# Altium PCB RheoBoard_v2.PcbDoc (part 2 of 5)
Units mm, origin at the board's own origin, x right, y up, seen from the top; angles counter-clockwise.
Board outline 136.04 x 88.34 mm, 2 copper layers (Top Layer, Bottom Layer); 133 components, 71 nets, 341 pads, 184 vias.
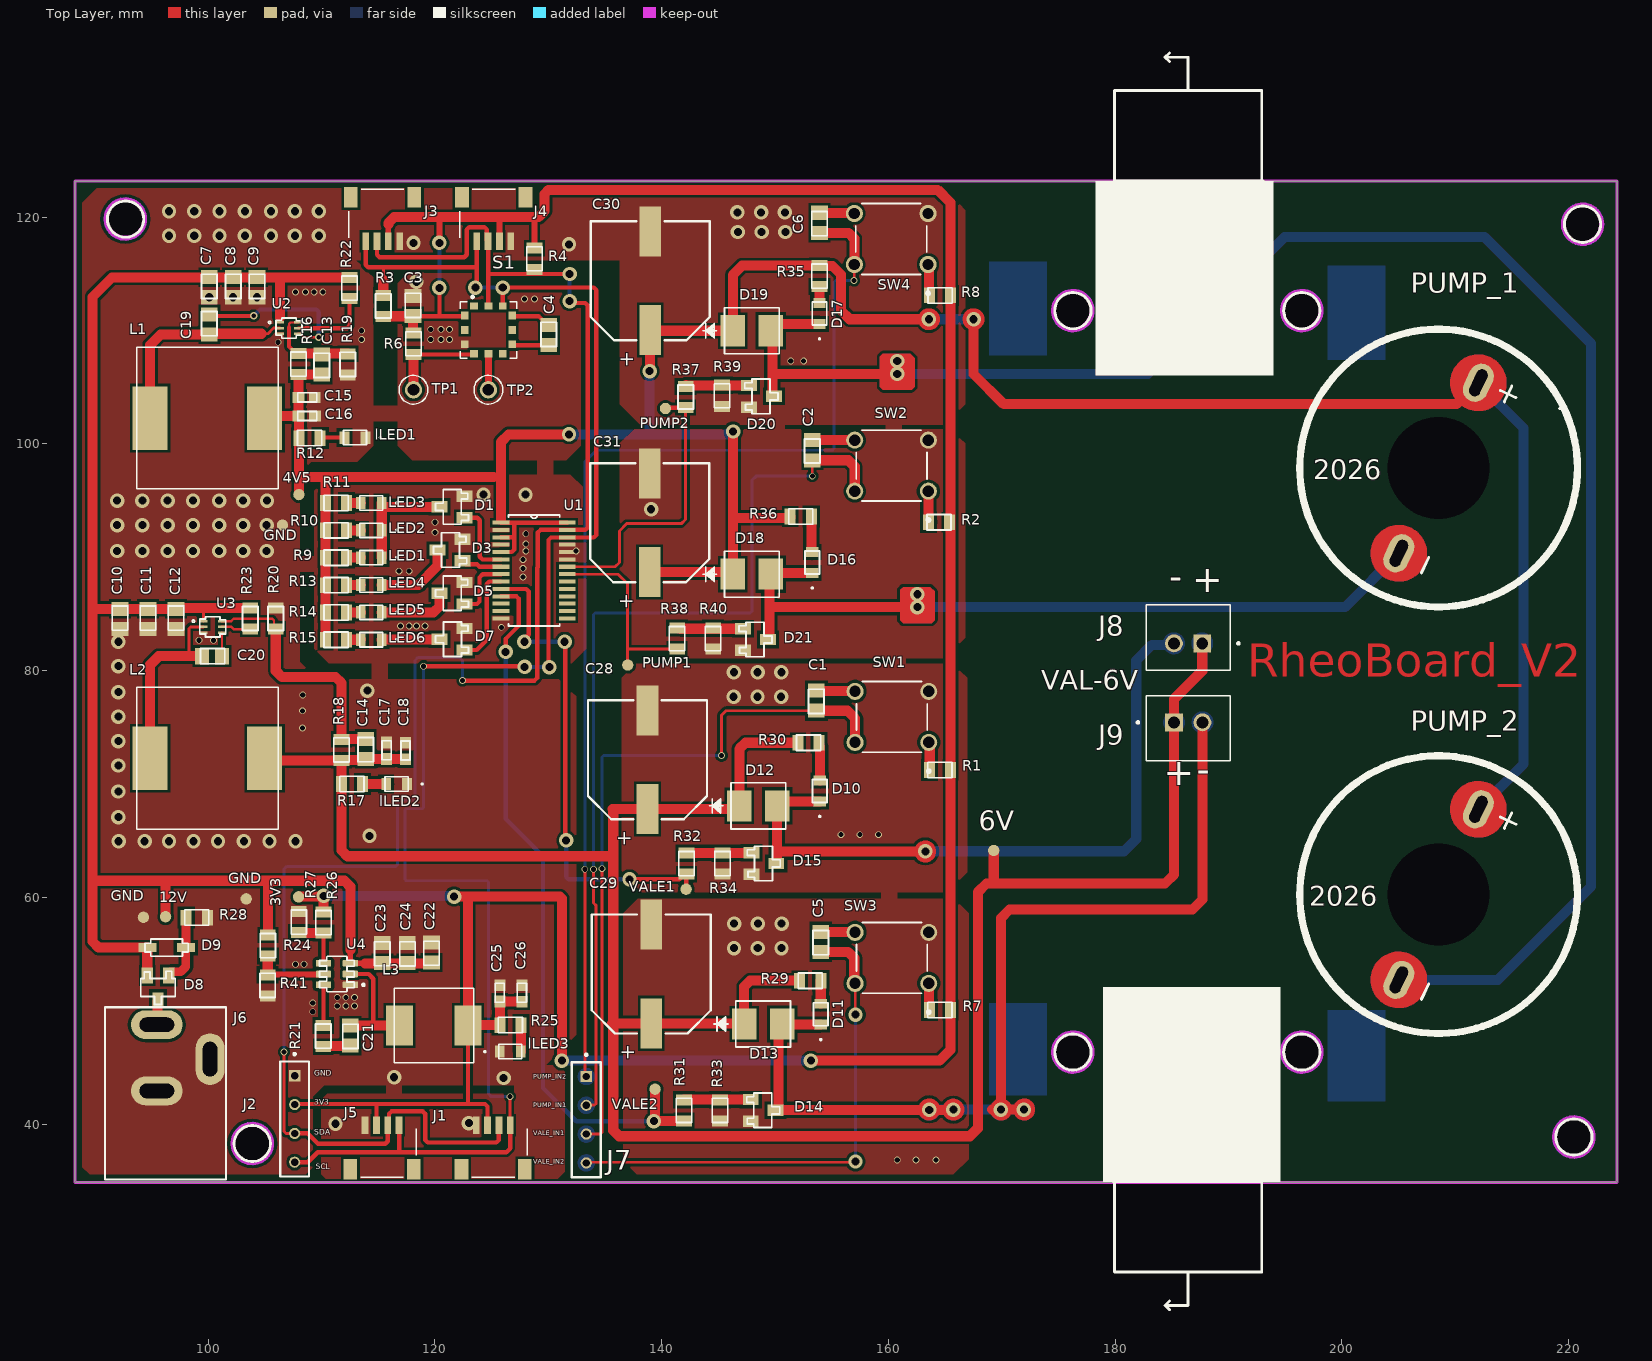
[diagram p0: Top Layer view]

## Part data (continued)
D12 D13 D18 D19: library part "DIODE SCHOTTKY 40V 3A DO214AB", "Rectifier Diode, Schottky, 1 Phase, 1 Element, 3A, 40V V(RRM), Silicon, DO-214AB", Average Rectified Current=3A, Case/Package=SMC, Forward Voltage=500mV, Manufacturer=onsemi, Manufacturer Lifecycle Status=ACTIVE, Manufacturer Part Number=SS34, Max Forward Surge Current (Ifsm)=100A, Max Junction Temperature (Tj)=150°C, Max Power Dissipation=2.27W, Max Repetitive Reverse Voltage (Vrrm)=40V, Max Reverse Leakage Current=500µA, Min Operating Temperature=-55°C, Peak Reverse Current=20mA, Supplier Part Number 1=SS34FSCT-ND, Category="Schottky Diodes", China RoHS=Non-Compliant, ComponentLink1Description=https://datasheet.octopart.com:443/SS34-onsemi-datasheet-180969540.pdf?src-supplier=IHS, ComponentLink1URL=https://datasheet.octopart.com:443/SS34-onsemi-datasheet-180969540.pdf?src-supplier=IHS, ComponentLink2Description=https://datasheet.octopart.com:443/SS34-Fairchild-Semiconductor-datasheet-182300316.pdf?src-supplier=IHS, ComponentLink2URL=https://datasheet.octopart.com:443/SS34-Fairchild-Semiconductor-datasheet-182300316.pdf?src-supplier=IHS, ComponentLink3Description=https://datasheet.octopart.com:443/SS34-ON-Semiconductor-datasheet-98150820.pdf?src-supplier=Upverter, ComponentLink3URL=https://datasheet.octopart.com:443/SS34-ON-Semiconductor-datasheet-98150820.pdf?src-supplier=Upverter, ComponentLink4Description=https://sigma.octopart.com:443/138897342/technical_drawing/ON-Semiconductor-SS34.pdf?src-supplier=Upverter, ComponentLink4URL=https://sigma.octopart.com:443/138897342/technical_drawing/ON-Semiconductor-SS34.pdf?src-supplier=Upverter, ComponentLink5Description=https://datasheet.octopart.com:443/SS34-Fairchild-datasheet-10247.pdf?src-supplier=Fairchild+Semiconductor, ComponentLink5URL=https://datasheet.octopart.com:443/SS34-Fairchild-datasheet-10247.pdf?src-supplier=Fairchild+Semiconductor, ComponentLink6Description=https://datasheet.octopart.com:443/SS34-ON-Semiconductor-datasheet-21199498.pdf?src-supplier=Fairchild+Semiconductor, ComponentLink6URL=https://datasheet.octopart.com:443/SS34-ON-Semiconductor-datasheet-21199498.pdf?src-supplier=Fairchild+Semiconductor, ComponentLink7Description=https://sigma.octopart.com:443/17345394/technical_drawing/Fairchild-Semiconductor-SS34.pdf?src-supplier=Fairchild+Semiconductor, ComponentLink7URL=https://sigma.octopart.com:443/17345394/technical_drawing/Fairchild-Semiconductor-SS34.pdf?src-supplier=Fairchild+Semiconductor, ComponentLink8Description=https://datasheet.octopart.com:443/SS34-ON-Semiconductor-datasheet-137362514.pdf?src-supplier=onsemi, ComponentLink8URL=https://datasheet.octopart.com:443/SS34-ON-Semiconductor-datasheet-137362514.pdf?src-supplier=onsemi, ComponentLink9Description=https://datasheet.octopart.com:443/SS34-ON-Semiconductor-datasheet-85599191.pdf?src-supplier=onsemi, ComponentLink9URL=https://datasheet.octopart.com:443/SS34-ON-Semiconductor-datasheet-85599191.pdf?src-supplier=onsemi, ComponentLink10Description=https://datasheet.octopart.com:443/SS34-ON-Semiconductor-datasheet-86698610.pdf?src-supplier=onsemi, ComponentLink10URL=https://datasheet.octopart.com:443/SS34-ON-Semiconductor-datasheet-86698610.pdf?src-supplier=onsemi, ComponentLink11Description=https://datasheet.octopart.com:443/SS34-ON-Semiconductor-datasheet-86692994.pdf?src-supplier=Farnell, ComponentLink11URL=https://datasheet.octopart.com:443/SS34-ON-Semiconductor-datasheet-86692994.pdf?src-supplier=Farnell, ComponentLink12Description=https://datasheet.octopart.com:443/SS34-Fairchild-Semiconductor-datasheet-16207785.pdf?src-supplier=Farnell, ComponentLink12URL=https://datasheet.octopart.com:443/SS34-Fairchild-Semiconductor-datasheet-16207785.pdf?src-supplier=Farnell, ComponentLink13Description=https://datasheet.octopart.com:443/SS34-Fairchild-Semiconductor-datasheet-17852663.pdf?src-supplier=Newark, ComponentLink13URL=https://datasheet.octopart.com:443/SS34-Fairchild-Semiconductor-datasheet-17852663.pdf?src-supplier=Newark, ComponentLink14Description=https://datasheet.octopart.com:443/SS34-Fairchild-Semiconductor-datasheet-66805556.pdf?src-supplier=Newark, ComponentLink14URL=https://datasheet.octopart.com:443/SS34-Fairchild-Semiconductor-datasheet-66805556.pdf?src-supplier=Newark, ComponentLink15Description=https://datasheet.octopart.com:443/SS34-ON-Semiconductor-datasheet-137713514.pdf?src-supplier=TME, ComponentLink15URL=https://datasheet.octopart.com:443/SS34-ON-Semiconductor-datasheet-137713514.pdf?src-supplier=TME, ComponentLink16Description=https://datasheet.octopart.com:443/SS34-Fairchild-Semiconductor-datasheet-10520288.pdf?src-supplier=Jameco+(USA), ComponentLink16URL=https://datasheet.octopart.com:443/SS34-Fairchild-Semiconductor-datasheet-10520288.pdf?src-supplier=Jameco+(USA), ComponentLink17Description=https://datasheet.octopart.com:443/SS34.-Fairchild-Semiconductor-datasheet-8187732.pdf?src-supplier=Jameco+(USA), ComponentLink17URL=https://datasheet.octopart.com:443/SS34.-Fairchild-Semiconductor-datasheet-8187732.pdf?src-supplier=Jameco+(USA), ComponentLink18Description=https://datasheet.octopart.com:443/SS34-Fairchild-Semiconductor-datasheet-14041527.pdf?src-supplier=iiiC, ComponentLink18URL=https://datasheet.octopart.com:443/SS34-Fairchild-Semiconductor-datasheet-14041527.pdf?src-supplier=iiiC, ComponentLink19Description=https://datasheet.octopart.com:443/SS34-Fairchild-datasheet-3545.pdf?src-supplier=DigiKey, ComponentLink19URL=https://datasheet.octopart.com:443/SS34-Fairchild-datasheet-3545.pdf?src-supplier=DigiKey, ComponentLink20Description=https://datasheet.octopart.com:443/SS34-Fairchild-Semiconductor-datasheet-67150810.pdf?src-supplier=element14+APAC, ComponentLink20URL=https://datasheet.octopart.com:443/SS34-Fairchild-Semiconductor-datasheet-67150810.pdf?src-supplier=element14+APAC, ComponentLink21Description=https://datasheet.octopart.com:443/SS34-Fairchild-Semiconductor-datasheet-67301494.pdf?src-supplier=element14+APAC, ComponentLink21URL=https://datasheet.octopart.com:443/SS34-Fairchild-Semiconductor-datasheet-67301494.pdf?src-supplier=element14+APAC, ComponentLink22Description=https://datasheet.octopart.com:443/SS34-Fairchild-Semiconductor-datasheet-68552117.pdf?src-supplier=element14+APAC, ComponentLink22URL=https://datasheet.octopart.com:443/SS34-Fairchild-Semiconductor-datasheet-68552117.pdf?src-supplier=element14+APAC, ComponentLink23Description=http://sigma.octopart.com:80/150631730/rohs_statement/ON-Semiconductor-SS34.pdf?src-supplier=Compliance+Statements, ComponentLink23URL=http://sigma.octopart.com:80/150631730/rohs_statement/ON-Semiconductor-SS34.pdf?src-supplier=Compliance+Statements, ComponentLink24Description=http://sigma.octopart.com:80/17357496/reach_statement/Fairchild-Semiconductor-SS34.pdf?src-supplier=Compliance+Statements, ComponentLink24URL=http://sigma.octopart.com:80/17357496/reach_statement/Fairchild-Semiconductor-SS34.pdf?src-supplier=Compliance+Statements, ComponentLink25Description=http://sigma.octopart.com:80/17357497/materials_sheet/Fairchild-Semiconductor-SS34.pdf?src-supplier=Compliance+Statements, ComponentLink25URL=http://sigma.octopart.com:80/17357497/materials_sheet/Fairchild-Semiconductor-SS34.pdf?src-supplier=Compliance+Statements, ComponentLink26Description=http://sigma.octopart.com:80/33332724/reach_statement/Fairchild-Semiconductor-SS34.pdf?src-supplier=Compliance+Statements, ComponentLink26URL=http://sigma.octopart.com:80/33332724/reach_statement/Fairchild-Semiconductor-SS34.pdf?src-supplier=Compliance+Statements, ComponentLink27Description=http://sigma.octopart.com:80/33332734/materials_sheet/Fairchild-Semiconductor-SS34.pdf?src-supplier=Compliance+Statements, ComponentLink27URL=http://sigma.octopart.com:80/33332734/materials_sheet/Fairchild-Semiconductor-SS34.pdf?src-supplier=Compliance+Statements, ComponentLink28Description=http://sigma.octopart.com:80/reach_statement/ON-Semiconductor-company-79.pdf?src-supplier=Compliance+Statements, ComponentLink28URL=http://sigma.octopart.com:80/reach_statement/ON-Semiconductor-company-79.pdf?src-supplier=Compliance+Statements, ComponentLink29Description=http://sigma.octopart.com:80/rohs_statement/Fairchild-Semiconductor-company-11.pdf?src-supplier=Compliance+Statements, ComponentLink29URL=http://sigma.octopart.com:80/rohs_statement/Fairchild-Semiconductor-company-11.pdf?src-supplier=Compliance+Statements, ComponentLink30Description=http://sigma.octopart.com:80/rohs_statement/Fairchild-Semiconductor-company-10.pdf?src-supplier=Compliance+Statements, ComponentLink30URL=http://sigma.octopart.com:80/rohs_statement/Fairchild-Semiconductor-company-10.pdf?src-supplier=Compliance+Statements, ComponentLink31Description=http://sigma.octopart.com:80/reach_statement/Fairchild-Semiconductor-company-9.pdf?src-supplier=Compliance+Statements, ComponentLink31URL=http://sigma.octopart.com:80/reach_statement/Fairchild-Semiconductor-company-9.pdf?src-supplier=Compliance+Statements, ComponentLink32Description=https://octopart.com:443/opatz8j6/c1?t=viccNpvfIttKsDU7SPWQ9y4zH2I5vQeoMbVHGqsPow6bTd-4svAQ8CJcd4JU32n4VIK7bfuhyC2yX38EOaXgXF3OB3U3oRNmsYMqF9qk35vU8wFPIavaR-14DwP6fbfQaPsGNFdN_Z8-1T4X_QOZn0ACTRQW8byAb0Zw5uR49QIr8HPTSX9wA8MtVUNYB4ZuZLRADJrwn9SaYPFjqtJKagfgGDofRU13OmWhy1c_plwGeXj2LiYJThcM9cEbMjTH7xu2uABYmy4NIzY74J7Q8JiWqla3RWJM-LTvXAKkcB--a8DU9_B_J9ViBINNo7GXDBnyWrsQ2PdViVATqoeVAswpd3Ua_w&src-supplier=Compliance+Statements, ComponentLink32URL=https://octopart.com:443/opatz8j6/c1?t=viccNpvfIttKsDU7SPWQ9y4zH2I5vQeoMbVHGqsPow6bTd-4svAQ8CJcd4JU32n4VIK7bfuhyC2yX38EOaXgXF3OB3U3oRNmsYMqF9qk35vU8wFPIavaR-14DwP6fbfQaPsGNFdN_Z8-1T4X_QOZn0ACTRQW8byAb0Zw5uR49QIr8HPTSX9wA8MtVUNYB4ZuZLRADJrwn9SaYPFjqtJKagfgGDofRU13OmWhy1c_plwGeXj2LiYJThcM9cEbMjTH7xu2uABYmy4NIzY74J7Q8JiWqla3RWJM-LTvXAKkcB--a8DU9_B_J9ViBINNo7GXDBnyWrsQ2PdViVATqoeVAswpd3Ua_w&src-supplier=Compliance+Statements, ComponentLink33Description=https://octopart.com:443/opatz8j6/c1?t=_Ew93NvA2dxwG6kofQaAnix6stlPTBjPbyWmO8Db9aMsASW0CRA-VD1GC5YrCPo5xMBMEc6PkW8nBAY-0ID6v98fVxoORUlMO7vUnc_LZQaUFcYwmy1pBK1xo08PDWFDFZQRA7yrC4Tgb3hqyw82Mhwc0TN8rdOHKrHbVJO-oT1u6EL8bRFOXGwObUWVyqJ9akJ_x2PJn8JCfxM8_Cnyz0kH90ZX7GKj6RwTms2s29FGBjvYi_glDXbA6upBMQv93sulurvZj4MQPnuGeqiiX-cFrWyFyjjroUcoWjQY0FBSydzhr6MAJmz09WkbpGZ5S232seQDF-n-PlgN17JSkdMRcdJN-sU&src-supplier=Compliance+Statements, ComponentLink33URL=https://octopart.com:443/opatz8j6/c1?t=_Ew93NvA2dxwG6kofQaAnix6stlPTBjPbyWmO8Db9aMsASW0CRA-VD1GC5YrCPo5xMBMEc6PkW8nBAY-0ID6v98fVxoORUlMO7vUnc_LZQaUFcYwmy1pBK1xo08PDWFDFZQRA7yrC4Tgb3hqyw82Mhwc0TN8rdOHKrHbVJO-oT1u6EL8bRFOXGwObUWVyqJ9akJ_x2PJn8JCfxM8_Cnyz0kH90ZX7GKj6RwTms2s29FGBjvYi_glDXbA6upBMQv93sulurvZj4MQPnuGeqiiX-cFrWyFyjjroUcoWjQY0FBSydzhr6MAJmz09WkbpGZ5S232seQDF-n-PlgN17JSkdMRcdJN-sU&src-supplier=Compliance+Statements, Contact Plating=Tin, Current=3A, Current Rating=3A, Element Configuration=Single, Export Control Classification Number (ECCN) Code=EAR99, Forward Current=3A, Harmonized Tariff Schedule (HTS) Code=8541.10.00.80, Height=2.65mm, Introduction Date=1999-01-01, Lead Free="Lead Free", Length=7.15mm, LIB MADE BY="MR HOANG", Lifecycle Status=Production, Link=https://linhkien.cxtvn.com/6533-ss34-diode-3a-40v.html, Max Operating Temperature=150°C, Max Output Current=3A, Max Reverse Voltage (DC)=40V, Max Surge Current=100A, Mount="Surface Mount", Number of Elements=1, Number of Pins=2, Number of Terminals=2, Output Current=3A, Packaging="Cut Tape", Peak Non-Repetitive Surge Current=100A, Polarity=Standard, Pricing 1="1=1.01, 10=0.631, 100=0.4108, 500=0.31576, 1000=0.28514 (USD)", Radiation Hardening=No, REACH SVHC=No, Reverse Standoff Voltage=40V, RoHS=Compliant, Schedule B="8541100080, 8541100080|8541100080|8541100080|8541100080|8541100080", Stock 1=73284, Supplier 1=DigiKey, Voltage=40V, Voltage Rating (DC)=40V, Width=6.25mm
J1 J3 J4 J5: library part "QWIIC CONNECTOR SMD 4-PIN", "Qwiic Connector SMD 4-PIN", Manufacturer=SparkFun, Supplier Part Number 1=1568-14417-ND, Category=Connectors, LIB MADE BY="MR HOANG", Link=https://www.lcsc.com/product-detail/C2859067.html?s_z=n_q_t_14417&spm=wm.fly.bg.5.xh___wm.ssy.tc.2.tz&lcsc_vid=FlMMUgJST1FcAwECRwALVlxQQAdaX1xfRFUPAlJUQFExVlNeTlFfV1NTRFRXUzsOAxUeFF5JWBYZEEoKFBINSQcJGk4MFQUIE0wKAhAHHg1BVlVWWQkaCgg%3D, Manufacturer Part Number=14417, Pricing 1="1=0.6 (USD)", Stock 1=5760, Supplier 1=DigiKey
J2 J7: library part "CONN HEADER VERT 4POS 2.54MM", "Samtec 2.54mmpitch4pSingle row pin header, TSseries, right angle, Through hole mounting", Color=Black, Manufacturer=Samtec, Manufacturer Lifecycle Status=PRODUCTION, Supplier Part Number 1=612-TS-104-T-A-ND, Category="Headers and Wire Housings", ComponentLink1Description=https://datasheet.octopart.com:443/TS-104-T-A-Samtec-datasheet-97318998.pdf?src-supplier=Electro+Sonic, ComponentLink1URL=https://datasheet.octopart.com:443/TS-104-T-A-Samtec-datasheet-97318998.pdf?src-supplier=Electro+Sonic, ComponentLink2Description=https://datasheet.octopart.com:443/TS-104-T-A-Samtec-datasheet-118235246.pdf?src-supplier=Electro+Sonic, ComponentLink2URL=https://datasheet.octopart.com:443/TS-104-T-A-Samtec-datasheet-118235246.pdf?src-supplier=Electro+Sonic, ComponentLink3Description=https://datasheet.octopart.com:443/TS-104-T-A-Samtec-datasheet-41643166.pdf?src-supplier=Newark, ComponentLink3URL=https://datasheet.octopart.com:443/TS-104-T-A-Samtec-datasheet-41643166.pdf?src-supplier=Newark, ComponentLink4Description=https://datasheet.octopart.com:443/TS-104-T-A-Samtec-datasheet-13698575.pdf?src-supplier=Newark, ComponentLink4URL=https://datasheet.octopart.com:443/TS-104-T-A-Samtec-datasheet-13698575.pdf?src-supplier=Newark, ComponentLink5Description=https://datasheet.octopart.com:443/TS-104-T-A-Samtec-datasheet-175953447.pdf?src-supplier=JRH+Electronics, ComponentLink5URL=https://datasheet.octopart.com:443/TS-104-T-A-Samtec-datasheet-175953447.pdf?src-supplier=JRH+Electronics, ComponentLink6Description=https://datasheet.octopart.com:443/TS-104-T-A-Samtec-datasheet-150856305.pdf?src-supplier=Sager+Electronics, ComponentLink6URL=https://datasheet.octopart.com:443/TS-104-T-A-Samtec-datasheet-150856305.pdf?src-supplier=Sager+Electronics, ComponentLink7Description=https://datasheet.octopart.com:443/TS-104-T-A-Samtec-datasheet-179090728.pdf?src-supplier=Sager+Electronics, ComponentLink7URL=https://datasheet.octopart.com:443/TS-104-T-A-Samtec-datasheet-179090728.pdf?src-supplier=Sager+Electronics, ComponentLink8Description=https://datasheet.octopart.com:443/TS-104-T-A-Samtec-datasheet-116533476.pdf?src-supplier=Toby+Electronics, ComponentLink8URL=https://datasheet.octopart.com:443/TS-104-T-A-Samtec-datasheet-116533476.pdf?src-supplier=Toby+Electronics, ComponentLink9Description=https://datasheet.octopart.com:443/TS-104-T-A-Samtec-datasheet-116536303.pdf?src-supplier=Toby+Electronics, ComponentLink9URL=https://datasheet.octopart.com:443/TS-104-T-A-Samtec-datasheet-116536303.pdf?src-supplier=Toby+Electronics, ComponentLink10Description=https://datasheet.octopart.com:443/TS-104-T-A-Samtec-datasheet-28904454.pdf?src-supplier=Farnell, ComponentLink10URL=https://datasheet.octopart.com:443/TS-104-T-A-Samtec-datasheet-28904454.pdf?src-supplier=Farnell, ComponentLink11Description=https://datasheet.octopart.com:443/TS-104-T-A-Samtec-datasheet-8451641.pdf?src-supplier=Farnell, ComponentLink11URL=https://datasheet.octopart.com:443/TS-104-T-A-Samtec-datasheet-8451641.pdf?src-supplier=Farnell, ComponentLink12Description=https://datasheet.octopart.com:443/TS-104-T-A-Samtec-datasheet-140570800.pdf?src-supplier=Arrow.cn, ComponentLink12URL=https://datasheet.octopart.com:443/TS-104-T-A-Samtec-datasheet-140570800.pdf?src-supplier=Arrow.cn, Contact Material=Brass, Contact Mating Length=4.2164mm, Contact Plating=Tin, Gender=Male, Height=2.54mm, Housing Color=Black, Housing Material=Plastic, Lead Free="Lead Free", Length=10.2mm, LIB MADE BY="MR HOANG", Lifecycle Status=Production, Link=https://linhkien.cxtvn.com/5709-jump-duc-don-1x4p-254mm-chan-thang-20c.html, Manufacturer Part Number=TS-104-T-A, Mount="Through Hole", Number of Contacts=4, Number of Positions=4, Number of Rows=1, Packaging=Bulk, Pitch=2.54mm, Pricing 1="1=0.79, 10=0.674, 100=0.5725, 500=0.51098, 1000=0.48658, 5000=0.43436, 10000=0.41364 (USD)", Radiation Hardening=No, REACH SVHC=Unaffected, RoHS=Compliant, Schedule B="8536694040, 8536694040|8536694040|8536694040|8536694040|8536694040", Stock 1=3883, Supplier 1=DigiKey, Termination=Solder, Width=2.54mm
J6: library part "CONN PWR JACK 2.1X5.5MM SOLDER", "DC Power Jack Connector WR-DC, Male, Right Angled, THT, 5 A, 24 V", Color=Black, Current Rating=5A, Flammability Rating="UL94 V-0", Insulation Resistance=100MΩ, Manufacturer="Wurth Elektronik", Manufacturer Lifecycle Status=ACTIVE, Max Operating Temperature=85°C, Min Operating Temperature=-40°C, Operating Supply Voltage=24V, Supplier Part Number 1=732-5930-ND, Category="Power Connectors", ComponentLink1Description=https://datasheet.octopart.com:443/694106301002-W%C3%BCrth-Elektronik-datasheet-111088219.pdf?src-supplier=Newark, ComponentLink1URL=https://datasheet.octopart.com:443/694106301002-W%C3%BCrth-Elektronik-datasheet-111088219.pdf?src-supplier=Newark, ComponentLink2Description=https://datasheet.octopart.com:443/694106301002-W%C3%BCrth-Elektronik-datasheet-38737356.pdf?src-supplier=Farnell, ComponentLink2URL=https://datasheet.octopart.com:443/694106301002-W%C3%BCrth-Elektronik-datasheet-38737356.pdf?src-supplier=Farnell, ComponentLink3Description=https://datasheet.octopart.com:443/694106301002-W%C3%BCrth-Elektronik-datasheet-66582004.pdf?src-supplier=Farnell, ComponentLink3URL=https://datasheet.octopart.com:443/694106301002-W%C3%BCrth-Elektronik-datasheet-66582004.pdf?src-supplier=Farnell, ComponentLink4Description="New link", Connector Type=Power, Contact Gender=Female, Contact Material="Gold, Tin", Contact Plating=Tin, Gender=Male, Height=11mm, Housing Material=Polyamide, LIB MADE BY="MR HOANG", Lifecycle Status=Production, Link=https://www.lcsc.com/product-detail/C5184829.html?s_z=n_q_694106301002&spm=wm.fly.bg.0.xh&lcsc_vid=FlMMUgJST1FcAwECRwALVlxQQAdaX1xfRFUPAlJUQFExVlNeTlBWV1NVQllaUjsOAxUeFF5JWBYZEEoKFBINSQcJGk4NBhADEA4cHktXRlhXSQwSGg0%3D, Manufacturer Part Number=694106301002, Mount="Through Hole", Number of Contacts=3, Packaging=Bulk, Pricing 1="1=0.97, 10=0.922, 50=0.817, 100=0.76, 500=0.6555, 1000=0.59885 (USD)", REACH SVHC=Unknown, RoHS=Compliant, Shielding=Unshielded, Stock 1=29038, Supplier 1=DigiKey, Termination="Through Hole", Voltage Rating=24V, YEOL="1 = Estimated lifetime > 10 years"
J8 J9: library part "CONN HEADER VERT 2POS 2.5MM", "Board Connector, 2 Contact(s), 1 Row(s), Male, Straight, Solder Terminal", Contact Resistance=20mΩ, Current Rating=3A, Insulation Resistance=1GΩ, Manufacturer=JST, Manufacturer Part Number=B2B-XH-A, Max Operating Temperature=85°C, Min Operating Temperature=-25°C, Supplier Part Number 1=455-B2B-XH-A-ND, Category="Card Edge Connectors", ComponentLink1Description=https://datasheet.octopart.com:443/B2B-XH-A-JST-datasheet-157850277.pdf?src-supplier=IHS, ComponentLink1URL=https://datasheet.octopart.com:443/B2B-XH-A-JST-datasheet-157850277.pdf?src-supplier=IHS, ComponentLink2Description=https://datasheet.octopart.com:443/B2B-XH-A-JST-datasheet-10026044.pdf?src-supplier=TME, ComponentLink2URL=https://datasheet.octopart.com:443/B2B-XH-A-JST-datasheet-10026044.pdf?src-supplier=TME, Contact Gender=Male, Contact Material=Brass, Housing Material=Nylon, LIB MADE BY="MR HOANG", Lifecycle Status=Production, Link=https://linhkien.cxtvn.com/8989-3-641215-2-connector-header-vert-2pos-254mm.html, Number of Pins=2, Number of Rows=1, Orientation=Straight, Pricing 1="1=0.1, 10=0.073, 100=0.0618, 500=0.05514, 1000=0.05251, 5000=0.04686, 10000=0.04463 (USD)", RoHS=Compliant, Stock 1=167385, Supplier 1=DigiKey, Terminal Pitch=2.54mm
L1 L2: library part "FIXED IND 2.2UH 3A 45 MOHM SMD", "Inductor Power Shielded Wirewound 2.2uH 20% 100KHz Ferrite 3.1A 0.045Ohm DCR 1515 T/R", Case/Package=1515, Current Rating=3A, DC resistance (DCR)=45mΩ, Inductance=2.2µH, Inductance Tolerance=20%, Manufacturer=Vishay, Manufacturer Part Number=IFSC1515AHER2R2M01, Max Current Rating=2.8A, Max Operating Temperature=125°C, Min Operating Temperature=-55°C, Resistance=35mΩ, RMS Current (Irms)=3.1A, Supplier Part Number 1=541-1404-6-ND, Test Frequency=100kHz, Category="Fixed Inductors", ComponentLink1Description=https://datasheet.octopart.com:443/IFSC1515AHER2R2M01-Vishay-datasheet-136687317.pdf?src-supplier=Newark, ComponentLink1URL=https://datasheet.octopart.com:443/IFSC1515AHER2R2M01-Vishay-datasheet-136687317.pdf?src-supplier=Newark, ComponentLink2Description=https://datasheet.octopart.com:443/IFSC1515AHER2R2M01-Vishay-datasheet-13160403.pdf?src-supplier=Newark, ComponentLink2URL=https://datasheet.octopart.com:443/IFSC1515AHER2R2M01-Vishay-datasheet-13160403.pdf?src-supplier=Newark, ComponentLink3Description=https://datasheet.octopart.com:443/IFSC1515AHER2R2M01-Vishay-datasheet-13060574.pdf?src-supplier=Newark, ComponentLink3URL=https://datasheet.octopart.com:443/IFSC1515AHER2R2M01-Vishay-datasheet-13060574.pdf?src-supplier=Newark, ComponentLink4Description=https://datasheet.octopart.com:443/IFSC1515AHER2R2M01-Vishay-datasheet-41303275.pdf?src-supplier=Newark, ComponentLink4URL=https://datasheet.octopart.com:443/IFSC1515AHER2R2M01-Vishay-datasheet-41303275.pdf?src-supplier=Newark, ComponentLink5Description=https://datasheet.octopart.com:443/IFSC1515AHER2R2M01-Vishay-datasheet-79543287.pdf?src-supplier=Upverter, ComponentLink5URL=https://datasheet.octopart.com:443/IFSC1515AHER2R2M01-Vishay-datasheet-79543287.pdf?src-supplier=Upverter, ComponentLink6Description=https://datasheet.octopart.com:443/IFSC1515AHER2R2M01-Vishay-datasheet-193387337.pdf?src-supplier=JRH+Electronics, ComponentLink6URL=https://datasheet.octopart.com:443/IFSC1515AHER2R2M01-Vishay-datasheet-193387337.pdf?src-supplier=JRH+Electronics, ComponentLink7Description=https://datasheet.octopart.com:443/IFSC1515AHER2R2M01-Vishay-datasheet-66100361.pdf?src-supplier=Farnell, ComponentLink7URL=https://datasheet.octopart.com:443/IFSC1515AHER2R2M01-Vishay-datasheet-66100361.pdf?src-supplier=Farnell, ComponentLink8Description=https://datasheet.octopart.com:443/IFSC1515AHER2R2M01-Vishay-datasheet-17360805.pdf?src-supplier=Farnell, ComponentLink8URL=https://datasheet.octopart.com:443/IFSC1515AHER2R2M01-Vishay-datasheet-17360805.pdf?src-supplier=Farnell, ComponentLink9Description=https://datasheet.octopart.com:443/IFSC1515AHER2R2M01-Vishay-datasheet-41195463.pdf?src-supplier=Farnell, ComponentLink9URL=https://datasheet.octopart.com:443/IFSC1515AHER2R2M01-Vishay-datasheet-41195463.pdf?src-supplier=Farnell, ComponentLink10Description=https://datasheet.octopart.com:443/IFSC1515AHER2R2M01-Vishay-datasheet-62318043.pdf?src-supplier=element14+APAC, ComponentLink10URL=https://datasheet.octopart.com:443/IFSC1515AHER2R2M01-Vishay-datasheet-62318043.pdf?src-supplier=element14+APAC, ComponentLink11Description=https://datasheet.octopart.com:443/IFSC1515AHER2R2M01-Vishay-Dale-datasheet-41169526.pdf?src-supplier=element14+APAC, ComponentLink11URL=https://datasheet.octopart.com:443/IFSC1515AHER2R2M01-Vishay-Dale-datasheet-41169526.pdf?src-supplier=element14+APAC, ComponentLink12Description=http://sigma.octopart.com:80/rohs_statement/Vishay-company-15.pdf?src-supplier=Compliance+Statements, ComponentLink12URL=http://sigma.octopart.com:80/rohs_statement/Vishay-company-15.pdf?src-supplier=Compliance+Statements, Composition=Wirewound, Contact Plating=Tin, Core Material=Ferrite, Country of Origin="Mainland China", Depth=4mm, Export Control Classification Number (ECCN) Code=EAR99, Harmonized Tariff Schedule (HTS) Code=8504.50.80.00, Height=1.8mm, Height - Seated (Max)=1.905mm, Introduction Date=2011-04-11, Lead Free="Lead Free", Length=4mm, LIB MADE BY="MR HOANG", Lifecycle Status=Production, Link=https://linhkien.cxtvn.com/10174-cuon-cam-22uh-cd127-3a-12x12x7mm.html, Max DC Current=3A, Military Standard=Not, Mount="Surface Mount", Number of Circuits=1, Number of Pins=2, Number of Terminals=2, Pricing 1="1=0.43, 10=0.35, 100=0.2878, 1000=0.23664 (USD)", REACH SVHC=Yes, RoHS=Compliant, Saturation Current=2.8A, Schedule B="8504500000, 8504500000|8504500000|8504500000|8504500000|8504500000", Series Resistance=45mΩ, Shielding=Shielded, Stock 1=112441, Supplier 1=DigiKey, Termination=SMD/SMT, Tolerance=20%, Width=4mm
L3: library part "FIXED IND 4.7UH 6.3A 33 MOHM SMD", "FIXED IND 4.7UH 6.3A 33MOHM SMD / 4.7 µH Shielded Molded Inductor 6.3 A 33mOhm Max Nonstandard", Case/Package=2826, Current Rating=6.3A, DC resistance (DCR)=33mΩ, Inductance=4.7µH, Manufacturer=Sumida, Manufacturer Part Number=0630CDMCCDS-4R7MC, Max Operating Temperature=125°C, Min Operating Temperature=-55°C, Saturation Current=6.8A, Supplier Part Number 1=308-2466-1-ND, Test Frequency=100kHz, Tolerance=20%, Category="Fixed Inductors", ComponentLink1Description=https://datasheet.octopart.com:443/0630CDMCCDS-4R7MC-Sumida-datasheet-181250631.pdf?src-supplier=IHS, ComponentLink1URL=https://datasheet.octopart.com:443/0630CDMCCDS-4R7MC-Sumida-datasheet-181250631.pdf?src-supplier=IHS, ComponentLink2Description=https://datasheet.octopart.com:443/0630CDMCCDS-4R7MC-Sumida-datasheet-111957342.pdf?src-supplier=Future+Electronics, ComponentLink2URL=https://datasheet.octopart.com:443/0630CDMCCDS-4R7MC-Sumida-datasheet-111957342.pdf?src-supplier=Future+Electronics, Core Material=Metal, Export Control Classification Number (ECCN) Code=EAR99, Harmonized Tariff Schedule (HTS) Code=8504.50.80.00, Height=2.8mm, Height - Seated (Max)=2.9972mm, Introduction Date=2015-07-17, Length=7mm, Lifecycle Status=Production, Max Current Rating=6.3A, Max DC Current=6.3A, Mount="Surface Mount", Number of Circuits=1, Number of Terminals=2, Pricing 1="1=0.75, 10=0.617, 100=0.5073 (USD)", RoHS=Compliant, Shielding=Shielded, Stock 1=7042, Supplier 1=DigiKey, Width=6.6mm
LED1 LED2 LED3 lLED1 lLED2 lLED3: library part "LED RED DIFFUSED 0805 SMD", "Red 633nm LED Indication - Discrete 2V 0805 (2012 Metric)", Manufacturer=Osram, Manufacturer Part Number="LS R976-NR-1-0-20-R18", Supplier Part Number 1=475-LSR976-NR-1CT-ND, Category=LEDs, LIB MADE BY="MR HOANG", Link=https://linhkien.cxtvn.com/10106-17-21surcs530-a3tr8-led-red-0805-624nm-10c.html, Pricing 1="1=0.15, 10=0.102, 100=0.0704, 500=0.05582, 1000=0.05095, 2000=0.04679 (USD)", Schedule B="8541402000, 8541402000|8541402000, 8541402000|8541402000|8541402000, 8541402000|8541402000|8541402000|8541402000", Stock 1=254416, Supplier 1=DigiKey
PUMP_1 PUMP_2: library part "Air Pump and Vacuum DC Motor - 4.5 V and 2.5 LPM - ZR370-02PM", "Connector Header 2 Position 6.35mm Solder Straight Thru-Hole 2 Terminal 1 Port MLX-Series", Color=Natural, Contact Resistance=3.5mΩ, Current Rating=13.5A, Dielectric Material=Polyester, Flammability Rating="UL94 V-2", Insulation Resistance=1GΩ, Manufacturer=Molex, Manufacturer Lifecycle Status=ACTIVE, Manufacturer Part Number=10-84-4022, Max Operating Temperature=105°C, Min Operating Temperature=-55°C, Operating Force=6.672N, Ratings=CSA, Supplier Part Number 1=WM1263-ND, Voltage Rating=600V, Category="Headers and Wire Housings", China RoHS=Compliant, ComponentLink1Description=https://datasheet.octopart.com:443/10-84-4022-Molex-datasheet-137053637.pdf?src-supplier=element14+APAC, ComponentLink1URL=https://datasheet.octopart.com:443/10-84-4022-Molex-datasheet-137053637.pdf?src-supplier=element14+APAC, ComponentLink2Description=https://datasheet.octopart.com:443/10-84-4022-Molex-datasheet-13791970.pdf?src-supplier=Molex, ComponentLink2URL=https://datasheet.octopart.com:443/10-84-4022-Molex-datasheet-13791970.pdf?src-supplier=Molex, ComponentLink3Description=https://sigma.octopart.com:443/16272272/technical_drawing/Molex-10-84-4022.pdf?src-supplier=Molex, ComponentLink3URL=https://sigma.octopart.com:443/16272272/technical_drawing/Molex-10-84-4022.pdf?src-supplier=Molex, ComponentLink4Description=https://datasheet.octopart.com:443/010844022-Molex-datasheet-5390850.pdf?src-supplier=Molex, ComponentLink4URL=https://datasheet.octopart.com:443/010844022-Molex-datasheet-5390850.pdf?src-supplier=Molex, ComponentLink5Description=https://datasheet.octopart.com:443/10-84-4022-Molex-datasheet-193058052.pdf?src-supplier=JRH+Electronics, ComponentLink5URL=https://datasheet.octopart.com:443/10-84-4022-Molex-datasheet-193058052.pdf?src-supplier=JRH+Electronics, ComponentLink6Description=https://datasheet.octopart.com:443/10-84-4022-Molex-datasheet-154742841.pdf?src-supplier=JRH+Electronics, ComponentLink6URL=https://datasheet.octopart.com:443/10-84-4022-Molex-datasheet-154742841.pdf?src-supplier=JRH+Electronics, ComponentLink7Description=https://datasheet.octopart.com:443/10-84-4022-Molex-datasheet-33343972.pdf?src-supplier=Electro+Sonic, ComponentLink7URL=https://datasheet.octopart.com:443/10-84-4022-Molex-datasheet-33343972.pdf?src-supplier=Electro+Sonic, ComponentLink8Description=https://datasheet.octopart.com:443/10-84-4022-Molex-datasheet-21205596.pdf?src-supplier=Electro+Sonic, ComponentLink8URL=https://datasheet.octopart.com:443/10-84-4022-Molex-datasheet-21205596.pdf?src-supplier=Electro+Sonic, ComponentLink9Description=https://datasheet.octopart.com:443/10-84-4022-Molex-datasheet-62102692.pdf?src-supplier=Electro+Sonic, ComponentLink9URL=https://datasheet.octopart.com:443/10-84-4022-Molex-datasheet-62102692.pdf?src-supplier=Electro+Sonic, ComponentLink10Description=https://datasheet.octopart.com:443/10-84-4022-Molex-datasheet-140174504.pdf?src-supplier=RS+(Formerly+Allied+Electronics), ComponentLink10URL=https://datasheet.octopart.com:443/10-84-4022-Molex-datasheet-140174504.pdf?src-supplier=RS+(Formerly+Allied+Electronics), ComponentLink11Description=https://datasheet.octopart.com:443/10-84-4022-Molex-datasheet-120134962.pdf?src-supplier=RS+(Formerly+Allied+Electronics), ComponentLink11URL=https://datasheet.octopart.com:443/10-84-4022-Molex-datasheet-120134962.pdf?src-supplier=RS+(Formerly+Allied+Electronics), ComponentLink12Description=https://datasheet.octopart.com:443/10-84-4022-Molex-datasheet-32867450.pdf?src-supplier=Newark, ComponentLink12URL=https://datasheet.octopart.com:443/10-84-4022-Molex-datasheet-32867450.pdf?src-supplier=Newark, ComponentLink13Description=https://datasheet.octopart.com:443/10844022-Molex-datasheet-8320017.pdf?src-supplier=Jameco+(USA), ComponentLink13URL=https://datasheet.octopart.com:443/10844022-Molex-datasheet-8320017.pdf?src-supplier=Jameco+(USA), ComponentLink14Description=https://datasheet.octopart.com:443/10-84-4022-Molex-datasheet-5314522.pdf?src-supplier=Verical, ComponentLink14URL=https://datasheet.octopart.com:443/10-84-4022-Molex-datasheet-5314522.pdf?src-supplier=Verical, ComponentLink15Description=https://datasheet.octopart.com:443/10-84-4022-Molex-datasheet-27226.pdf?src-supplier=DigiKey, ComponentLink15URL=https://datasheet.octopart.com:443/10-84-4022-Molex-datasheet-27226.pdf?src-supplier=DigiKey, ComponentLink16Description=http://sigma.octopart.com:80/16272275/rohs_statement/Molex-10-84-4022.pdf?src-supplier=Compliance+Statements, ComponentLink16URL=http://sigma.octopart.com:80/16272275/rohs_statement/Molex-10-84-4022.pdf?src-supplier=Compliance+Statements, ComponentLink17Description=http://sigma.octopart.com:80/reach_statement/Molex-company-74.pdf?src-supplier=Compliance+Statements, ComponentLink17URL=http://sigma.octopart.com:80/reach_statement/Molex-company-74.pdf?src-supplier=Compliance+Statements, ComponentLink18Description=http://sigma.octopart.com:80/rohs_statement/Molex-company-73.pdf?src-supplier=Compliance+Statements, ComponentLink18URL=http://sigma.octopart.com:80/rohs_statement/Molex-company-73.pdf?src-supplier=Compliance+Statements, ComponentLink19Description=http://sigma.octopart.com:80/conflict_mineral_statement/Molex-company-72.pdf?src-supplier=Compliance+Statements, ComponentLink19URL=http://sigma.octopart.com:80/conflict_mineral_statement/Molex-company-72.pdf?src-supplier=Compliance+Statements, Connector Type=Power, Contact Gender=Female, Contact Material=Bronze, Contact Plating=Tin, Country of Origin=US, Export Control Classification Number (ECCN) Code=EAR99, Gender=Female, Glow Wire Compliant=Non-compliant, Halogen Free="Low Halogen", Harmonized Tariff Schedule (HTS) Code=8536.69.40.30, Housing Material=Nylon, Introduction Date=1994-12-01, Lead Free="Lead Free", LIB MADE BY="MR HOANG", Lifecycle Status=Production, Link=https://www.lcsc.com/product-detail/C6955946.html?s_z=n_q_p_0010844022&spm=wm.ssy.bg.0.xh&lcsc_vid=FlMMUgJST1FcAwECRwALVlxQQAdaX1xfRFUPAlJUQFExVlNeTlFaV1NTRVlYVTsOAxUeFF5JWBYZEEoKFBINSQcJGk4MFQUIE0wKAhAHHg1BVlVWWQkaCgg%3D, Mount="Through Hole", Number of Circuits=2, Number of Contacts=2, Number of Pins=2, Number of Positions=2, Number of Rows=1, Orientation=Vertical, Packaging=Carton, Pitch=6.35mm, Plating=Tin, Plating Thickness=3.5052µm, Pricing 1="1=0.51, 10=0.436, 100=0.3706, 500=0.33078, 1836=0.30175, 5508=0.27924, 11016=0.26592 (USD)", Radiation Hardening=No, REACH SVHC=Unaffected, RoHS=Compliant, Schedule B="8536694040, 8536694040|8536694040|8536694040|8536694040|8536694040", Shell Material=POLYAMIDE66, Stock 1=11507, Supplier 1=DigiKey, Terminal Pitch=6.35mm, Termination=Solder
R1 R2 R3 R4 R6 R7 R8 R33 R34 R39 R40: library part "RES_SMD 10K 1% 1/4W 0805", "Res Thick Film 0805 10K Ohm 1% 0.125W(1/8W) ±100ppm/C Pad SMD Automotive T/R", Case Code (Imperial)=0805, Manufacturer=Vishay, Manufacturer Package Identifier=CRCW0805-e3, Manufacturer Part Number=CRCW080510K0FKEA, Max Operating Temperature=155°C, Min Operating Temperature=-55°C, Power Dissipation=125mW, Power Rating=120mW, Resistance=10kΩ, Supplier Part Number 1=541-10.0KCTR-ND, Temperature Coefficient=100ppm/°C, Tolerance=1%, Voltage Rating=150V, Case/Package=0805, Category="Chip SMD Resistors", China RoHS=Non-Compliant, ComponentLink1Description=https://datasheet.octopart.com:443/CRCW080510K0FKEA-Vishay-datasheet-175423584.pdf?src-supplier=IHS, ComponentLink1URL=https://datasheet.octopart.com:443/CRCW080510K0FKEA-Vishay-datasheet-175423584.pdf?src-supplier=IHS, ComponentLink2Description=https://datasheet.octopart.com:443/CRCW080510K0FKEA-Vishay-datasheet-5300368.pdf?src-supplier=Future+Electronics, ComponentLink2URL=https://datasheet.octopart.com:443/CRCW080510K0FKEA-Vishay-datasheet-5300368.pdf?src-supplier=Future+Electronics, ComponentLink3Description=https://datasheet.octopart.com:443/CRCW080510K0FKEA-Vishay-datasheet-62316122.pdf?src-supplier=Future+Electronics, ComponentLink3URL=https://datasheet.octopart.com:443/CRCW080510K0FKEA-Vishay-datasheet-62316122.pdf?src-supplier=Future+Electronics, ComponentLink4Description=https://datasheet.octopart.com:443/CRCW080510K0FKEA-Vishay-datasheet-83961561.pdf?src-supplier=Newark, ComponentLink4URL=https://datasheet.octopart.com:443/CRCW080510K0FKEA-Vishay-datasheet-83961561.pdf?src-supplier=Newark, ComponentLink5Description=https://datasheet.octopart.com:443/CRCW080510K0FKEA-Vishay-datasheet-14722531.pdf?src-supplier=Newark, ComponentLink5URL=https://datasheet.octopart.com:443/CRCW080510K0FKEA-Vishay-datasheet-14722531.pdf?src-supplier=Newark, ComponentLink6Description=https://datasheet.octopart.com:443/CRCW080510K0FKEA-Vishay-datasheet-62317937.pdf?src-supplier=Newark, ComponentLink6URL=https://datasheet.octopart.com:443/CRCW080510K0FKEA-Vishay-datasheet-62317937.pdf?src-supplier=Newark, ComponentLink7Description=https://datasheet.octopart.com:443/CRCW080510K0FKEA-Vishay-datasheet-11516975.pdf?src-supplier=Newark, ComponentLink7URL=https://datasheet.octopart.com:443/CRCW080510K0FKEA-Vishay-datasheet-11516975.pdf?src-supplier=Newark, ComponentLink8Description=https://datasheet.octopart.com:443/CRCW080510K0FKEA-Vishay-datasheet-183883877.pdf?src-supplier=Newark, ComponentLink8URL=https://datasheet.octopart.com:443/CRCW080510K0FKEA-Vishay-datasheet-183883877.pdf?src-supplier=Newark, ComponentLink9Description=https://datasheet.octopart.com:443/CRCW080510K0FKEA-Vishay-datasheet-41302739.pdf?src-supplier=Newark, ComponentLink9URL=https://datasheet.octopart.com:443/CRCW080510K0FKEA-Vishay-datasheet-41302739.pdf?src-supplier=Newark, ComponentLink10Description=https://datasheet.octopart.com:443/CRCW080510K0FKEA-Vishay-datasheet-27121962.pdf?src-supplier=Newark, ComponentLink10URL=https://datasheet.octopart.com:443/CRCW080510K0FKEA-Vishay-datasheet-27121962.pdf?src-supplier=Newark, ComponentLink11Description=https://datasheet.octopart.com:443/CRCW080510K0FKEA-Vishay-datasheet-16179825.pdf?src-supplier=element14+APAC, ComponentLink11URL=https://datasheet.octopart.com:443/CRCW080510K0FKEA-Vishay-datasheet-16179825.pdf?src-supplier=element14+APAC, ComponentLink12Description=https://datasheet.octopart.com:443/CRCW080510K0FKEA-Vishay-datasheet-66077789.pdf?src-supplier=element14+APAC, ComponentLink12URL=https://datasheet.octopart.com:443/CRCW080510K0FKEA-Vishay-datasheet-66077789.pdf?src-supplier=element14+APAC, ComponentLink13Description=https://datasheet.octopart.com:443/CRCW080510K0FKEA-Vishay-datasheet-5306405.pdf?src-supplier=RS+(Formerly+Allied+Electronics), ComponentLink13URL=https://datasheet.octopart.com:443/CRCW080510K0FKEA-Vishay-datasheet-5306405.pdf?src-supplier=RS+(Formerly+Allied+Electronics), ComponentLink14Description=https://datasheet.octopart.com:443/CRCW080510K0FKEA-Vishay-Dale-datasheet-47688880.pdf?src-supplier=RS+(Formerly+Allied+Electronics), ComponentLink14URL=https://datasheet.octopart.com:443/CRCW080510K0FKEA-Vishay-Dale-datasheet-47688880.pdf?src-supplier=RS+(Formerly+Allied+Electronics), ComponentLink15Description=https://datasheet.octopart.com:443/CRCW080510K0FKEA-Vishay-datasheet-12001583.pdf?src-supplier=RS+(Formerly+Allied+Electronics), ComponentLink15URL=https://datasheet.octopart.com:443/CRCW080510K0FKEA-Vishay-datasheet-12001583.pdf?src-supplier=RS+(Formerly+Allied+Electronics), ComponentLink16Description=https://datasheet.octopart.com:443/CRCW080510K0FKEA-Vishay-datasheet-17834126.pdf?src-supplier=TME, ComponentLink16URL=https://datasheet.octopart.com:443/CRCW080510K0FKEA-Vishay-datasheet-17834126.pdf?src-supplier=TME, ComponentLink17Description=https://datasheet.octopart.com/D-CRCW-e3-Standard-Thick-Film-Chip-Resistors-Vishay-datasheet-family-64.pdf, ComponentLink17URL=https://datasheet.octopart.com/D-CRCW-e3-Standard-Thick-Film-Chip-Resistors-Vishay-datasheet-family-64.pdf, ComponentLink18Description=https://datasheet.octopart.com:443/CRCW080510K0FKEA-Vishay-datasheet-13242068.pdf?src-supplier=Farnell, ComponentLink18URL=https://datasheet.octopart.com:443/CRCW080510K0FKEA-Vishay-datasheet-13242068.pdf?src-supplier=Farnell, ComponentLink19Description=https://datasheet.octopart.com:443/CRCW080510K0FKEA-Vishay-datasheet-13195083.pdf?src-supplier=Farnell, ComponentLink19URL=https://datasheet.octopart.com:443/CRCW080510K0FKEA-Vishay-datasheet-13195083.pdf?src-supplier=Farnell, ComponentLink20Description=https://datasheet.octopart.com:443/CRCW080510K0FKEA-Vishay-datasheet-13034211.pdf?src-supplier=Farnell, ComponentLink20URL=https://datasheet.octopart.com:443/CRCW080510K0FKEA-Vishay-datasheet-13034211.pdf?src-supplier=Farnell, ComponentLink21Description=https://datasheet.octopart.com:443/CRCW080510K0FKEA-Vishay-datasheet-12600034.pdf?src-supplier=Farnell, ComponentLink21URL=https://datasheet.octopart.com:443/CRCW080510K0FKEA-Vishay-datasheet-12600034.pdf?src-supplier=Farnell, ComponentLink22Description=https://datasheet.octopart.com:443/CRCW080510K0FKEA-Vishay-datasheet-12532161.pdf?src-supplier=Farnell, ComponentLink22URL=https://datasheet.octopart.com:443/CRCW080510K0FKEA-Vishay-datasheet-12532161.pdf?src-supplier=Farnell, ComponentLink23Description=https://datasheet.octopart.com:443/CRCW080510K0FKEA-Vishay-datasheet-12517896.pdf?src-supplier=Farnell, ComponentLink23URL=https://datasheet.octopart.com:443/CRCW080510K0FKEA-Vishay-datasheet-12517896.pdf?src-supplier=Farnell, ComponentLink24Description=https://datasheet.octopart.com:443/CRCW080510K0FKEA-Vishay-datasheet-12509762.pdf?src-supplier=Farnell, ComponentLink24URL=https://datasheet.octopart.com:443/CRCW080510K0FKEA-Vishay-datasheet-12509762.pdf?src-supplier=Farnell, ComponentLink25Description=https://datasheet.octopart.com:443/CRCW080510K0FKEA-Vishay-datasheet-10322335.pdf?src-supplier=Farnell, ComponentLink25URL=https://datasheet.octopart.com:443/CRCW080510K0FKEA-Vishay-datasheet-10322335.pdf?src-supplier=Farnell, ComponentLink26Description=https://datasheet.octopart.com:443/CRCW080510K0FKEA-Vishay-datasheet-8788789.pdf?src-supplier=Farnell, ComponentLink26URL=https://datasheet.octopart.com:443/CRCW080510K0FKEA-Vishay-datasheet-8788789.pdf?src-supplier=Farnell, ComponentLink27Description=https://datasheet.octopart.com:443/CRCW080510K0FKEA-Vishay-datasheet-8361388.pdf?src-supplier=Farnell, ComponentLink27URL=https://datasheet.octopart.com:443/CRCW080510K0FKEA-Vishay-datasheet-8361388.pdf?src-supplier=Farnell, ComponentLink28Description=https://datasheet.octopart.com:443/CRCW080510K0FKEA-Vishay-datasheet-546287.pdf?src-supplier=Farnell, ComponentLink28URL=https://datasheet.octopart.com:443/CRCW080510K0FKEA-Vishay-datasheet-546287.pdf?src-supplier=Farnell, ComponentLink29Description=https://datasheet.octopart.com:443/CRCW080510K0FKEA-Vishay-datasheet-11540273.pdf?src-supplier=Arrow+Electronics, ComponentLink29URL=https://datasheet.octopart.com:443/CRCW080510K0FKEA-Vishay-datasheet-11540273.pdf?src-supplier=Arrow+Electronics, ComponentLink30Description=https://datasheet.octopart.com:443/CRCW080510K0FKEA-Vishay-datasheet-8445837.pdf?src-supplier=element14, ComponentLink30URL=https://datasheet.octopart.com:443/CRCW080510K0FKEA-Vishay-datasheet-8445837.pdf?src-supplier=element14, ComponentLink31Description=https://datasheet.octopart.com:443/CRCW080510K0FKEA-Vishay-datasheet-5377306.pdf?src-supplier=Garrett, ComponentLink31URL=https://datasheet.octopart.com:443/CRCW080510K0FKEA-Vishay-datasheet-5377306.pdf?src-supplier=Garrett, ComponentLink32Description=https://datasheet.octopart.com:443/CRCW080510K0FKEA-Vishay-datasheet-148188.pdf?src-supplier=Garrett, ComponentLink32URL=https://datasheet.octopart.com:443/CRCW080510K0FKEA-Vishay-datasheet-148188.pdf?src-supplier=Garrett, ComponentLink33Description=https://datasheet.octopart.com:443/CRCW080510K0FKEA-Vishay-datasheet-34203.pdf?src-supplier=Garrett, ComponentLink33URL=https://datasheet.octopart.com:443/CRCW080510K0FKEA-Vishay-datasheet-34203.pdf?src-supplier=Garrett, ComponentLink34Description=http://sigma.octopart.com:80/rohs_certificate/D-CRCW-e3-Standard-Thick-Film-Chip-Resistors-Vishay-family-102.pdf?src-supplier=Compliance+Statements, ComponentLink34URL=http://sigma.octopart.com:80/rohs_certificate/D-CRCW-e3-Standard-Thick-Film-Chip-Resistors-Vishay-family-102.pdf?src-supplier=Compliance+Statements, Composition="Thick Film", Contact Plating=Tin, Country of Origin=Israel, Depth=1.25mm, Export Control Classification Number (ECCN) Code=EAR99, Harmonized Tariff Schedule (HTS) Code=8533.21.00.30, Height=450µm, Introduction Date=2005-02-16, Lead Free="Lead Free", Length=2mm, LIB MADE BY="MR HOANG", Lifecycle Status=Production, Link=https://linhkien.cxtvn.com/6741-dien-tro-10k-0805-1-50c.html, Military Standard=Not, Mount="Surface Mount", Number of Pins=2, Number of Terminals=2, Packaging="Cut Tape", Pricing 1="5000=0.00769, 10000=0.00759, 15000=0.00754, 25000=0.00749, 35000=0.00745, 50000=0.0073, 60000=0.00718, 120000=0.00678, 125000=0.00676 (USD)", Radiation Hardening=No, REACH SVHC=Yes, RoHS=Compliant, Schedule B="8533210045, 8533210045|8533210045|8533210045|8533210045|8533210045|8533210045|8533210045|8533210045|8533210045|8533210045|8533210045|8533210045|8533210045|8533210045|8533210045|8533210045|8533210045|8533210045|8533210045|8533210045|8533210045|8533210045|8533210045|85", Stock 1=1195000, Supplier 1=DigiKey, Termination=SMD/SMT, Voltage Rating (DC)=150V, Weight=5.499807mg, Width=1.25mm, Working Voltage=150V
R9 R10 R11 R13 R14 R15 R29 R30 R35 R36: library part "RES_SMD 220 OHM 1% 1/8W 0805", "Res Thick Film 0805 220 Ohm 1% 0.125W(1/8W) ±100ppm/C Pad SMD Automotive T/R", Ambient Temperature Range High=70°C, Case/Package=0805, Manufacturer="TE Connectivity", Manufacturer Lifecycle Status=ACTIVE, Manufacturer Part Number=CRGCQ0805F220R, Max Operating Temperature=155°C, Min Operating Temperature=-55°C, Operating Supply Voltage=150V, Power Rating=125mW, Ratings=AEC-Q200, Resistance=220Ω, Supplier Part Number 1=A129741TR-ND, Temperature Coefficient=100ppm/°C, Tolerance=1%, Category="Chip SMD Resistors", China RoHS=Non-Compliant, ComponentLink1Description=https://datasheet.octopart.com:443/CRGCQ0805F220R-TE-Connectivity-datasheet-114679081.pdf?src-supplier=JRH+Electronics, ComponentLink1URL=https://datasheet.octopart.com:443/CRGCQ0805F220R-TE-Connectivity-datasheet-114679081.pdf?src-supplier=JRH+Electronics, ComponentLink2Description=https://sigma.octopart.com:443/114695583/technical_drawing/TE-Connectivity-CRGCQ0805F220R.pdf?src-supplier=Sager+Electronics, ComponentLink2URL=https://sigma.octopart.com:443/114695583/technical_drawing/TE-Connectivity-CRGCQ0805F220R.pdf?src-supplier=Sager+Electronics, ComponentLink3Description=https://datasheet.octopart.com:443/1-2176341-7-TE-Connectivity---AMP-datasheet-189108688.pdf?src-supplier=Master+Electronics, ComponentLink3URL=https://datasheet.octopart.com:443/1-2176341-7-TE-Connectivity---AMP-datasheet-189108688.pdf?src-supplier=Master+Electronics, Composition="Thick Film", Height=550µm, Length=2mm, LIB MADE BY="MR HOANG", Lifecycle Status=Production, Link=https://linhkien.cxtvn.com/2742-dien-tro-220r-0805-1-100c.html, Mount="Surface Mount", Number of Terminals=2, Packaging="Cut Tape", Pricing 1="5000=0.01095, 10000=0.00993, 15000=0.00943, 25000=0.0089, 35000=0.00859, 50000=0.0083 (USD)", REACH SVHC=Unaffected, RoHS=Compliant, Schedule B="8533210025, 8533210025|8533210025|8533210025|8533210025|8533210025, 8533210045", Stock 1=950997, Supplier 1=DigiKey, Voltage Rating=150V, Voltage Rating (DC)=150V, Width=1.25mm, Working Voltage=150V